# Altium PCB DC116A_PCB_ASCII.PcbDoc (part 2 of 5)
Units mil, origin at the board's own origin, x right, y up, seen from the top; angles counter-clockwise.
Board outline 3300 x 2000 mil, 4 copper layers (Top Layer, GND1, PWR SPLIT PLANE, Bottom Layer), stack 58.64 mil thick; 315 components, 191 nets, 877 pads, 364 vias.
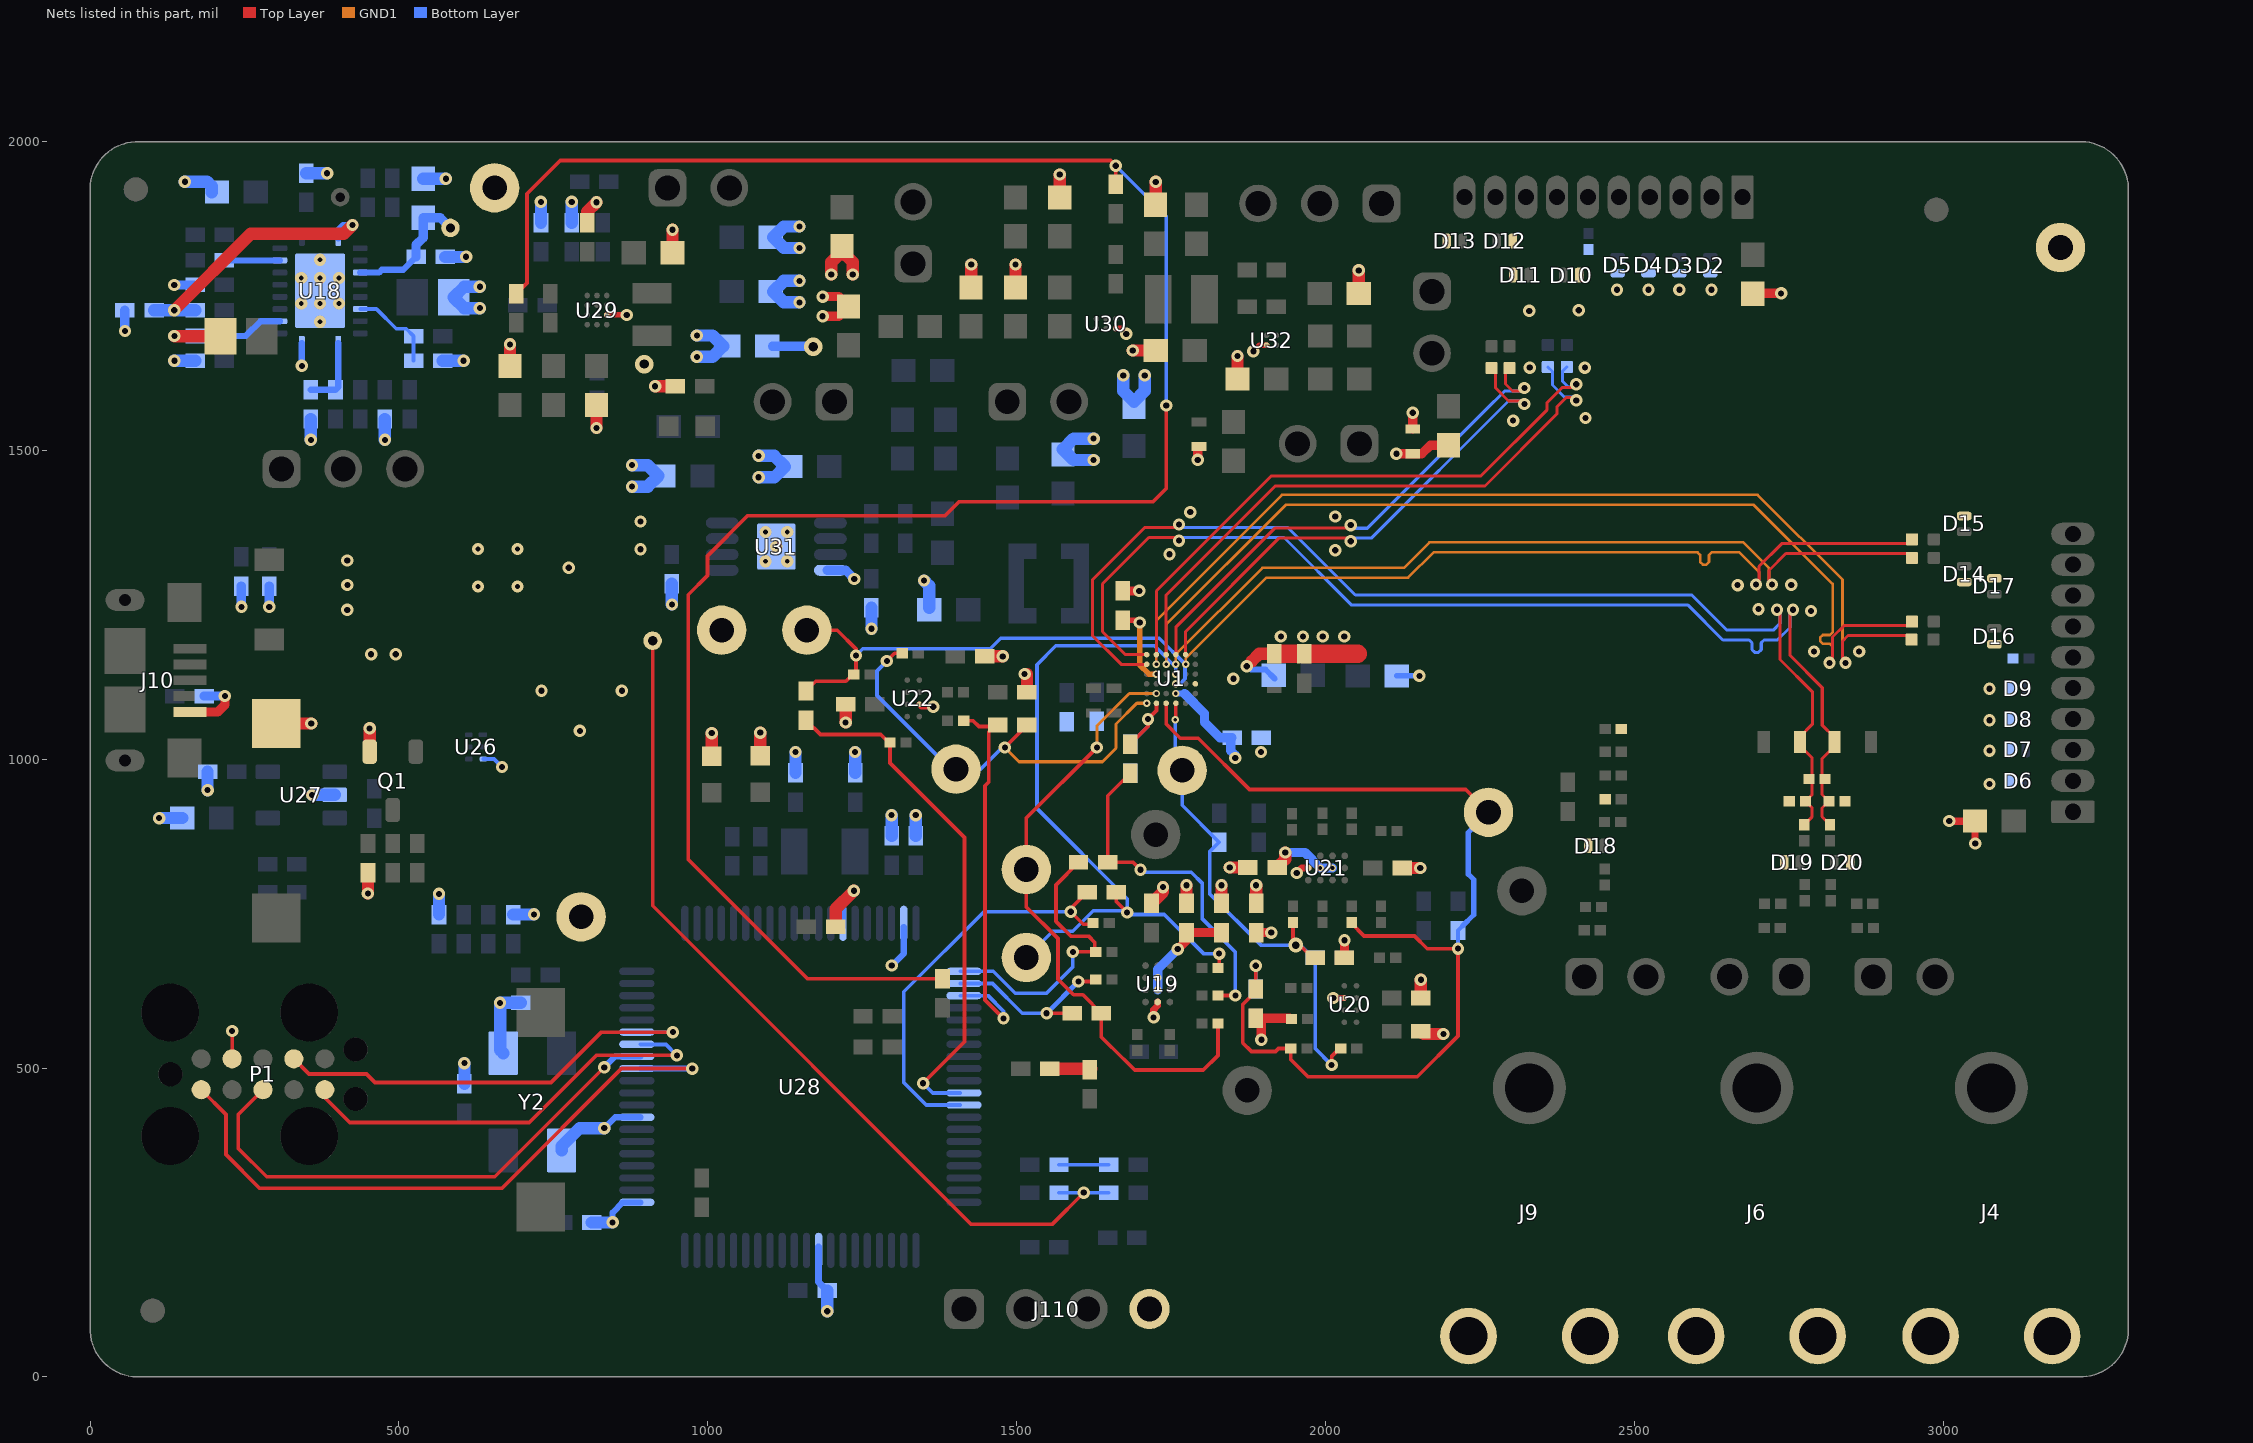
[diagram p4: the nets of this part, all layers, seen from the top]

## Part data
C1 C5 C6 C29 C54 C55 C56 C57 C59 C60 C61: library part CMP-0007007-5, "CAP, CERM, 10 uF, 25 V, +/- 20%, X5R, 0603", Cap_Case=0603, Manufacturer=TDK, PartNumber=C1608X5R1E106M080AC, Supplier Part Number 1=445-9015-1-ND, TempCo=X5R, Tolerance_%=20%, Value1="0.004639 ohm", Value2=25V, ValueDisplayed=10uF, AEC Category=Q200, AEC Grade=N/A, AEC Qualified=N, Cap_F=10µF, ComponentLink1Description="Datasheet link", ComponentLink1URL=https://product.tdk.com/en/search/capacitor/ceramic/mlcc/info?part_no=C1608X5R1E106M080AC, CompType=Capacitor, ESR_ohm=4.639m, IRMS_A=2.41407A, LatestRevisionDate=2017-03-09, MountType=SMT, PackageReference=0603, Polarized=N, Published=2008-06-19, Publisher="Texas Instruments", RoHS=Y, SizeArea_mm2=1.28, SizeAreaWB_mm2=4.68, SizeX_mm=1.6, SizeY_mm=0.8, SizeZ_mm=1, Supplier 1=Digi-Key, Supplier 2=Newark, Supplier 3=Mouser, Supplier Part Number 2=07W9179, Supplier Part Number 3=810-C1608X5R1E106M, TaMax_C=85°C, TaMin_C=-55°C, Technology=Ceramic, U/M=EA, VDC_V=25V
C2 C27 C73 C76: library part CMP-0006535-2, "CAP, CERM, 10 uF, 6.3 V, +/- 20%, X5R, 0402", Cap_Case=0402, Manufacturer=MuRata, Supplier Part Number 1=81-GRM155R60J106ME4D, TempCo=X5R, Tolerance_%=20%, Value1=Unknown, Value2=6.3V, ValueDisplayed=10uF, AEC Category=Q200, AEC Qualified=?, Cap_F=10µF, ComponentLink1Description="Datasheet link", ComponentLink1URL=https://sps06.itg.ti.com/sites/KMS/crossdivteams/altium/docs/ComponentDatasheets/grm155r60j106me44d.pdf, CompType=Capacitor, LatestRevisionDate=2017-03-09, MountType=SMT, PackageReference=0402, PartNumber=GRM155R60J106ME44D, Polarized=N, Published=2008-06-19, Publisher="Texas Instruments", RoHS=Y, SizeArea_mm2=0.5, SizeAreaWB_mm2=3, SizeX_mm=1, SizeY_mm=0.5, SizeZ_mm=0.7, Supplier 1=Mouser, TaMax_C=85°C, TaMin_C=-55°C, Technology=Ceramic, U/M=EA, VDC_V=6.3V
C3 C7 C64: library part CMP-0006296-2, "CAP, CERM, 1000 pF, 50 V, +/- 20%, X7R, 0402", Cap_Case=0402, Manufacturer=TDK, Supplier Part Number 1=445-173775-1-ND, TempCo=X7R, Tolerance_%=20%, Value1=Unknown, Value2=50V, ValueDisplayed=1000pF, AEC Category=Q200, AEC Grade=N/A, AEC Qualified=N, Cap_F=1nF, ComponentLink1Description="Datasheet link", ComponentLink1URL=https://product.tdk.com/info/en/catalog/datasheets/mlcc_commercial_soft_en.pdf, CompType=Capacitor, LatestRevisionDate=2017-03-09, MountType=SMT, PackageReference=0402, PartNumber=C1005X7R1H102M050BE, Polarized=N, Published=2008-06-19, Publisher="Texas Instruments", RoHS=Y, SizeArea_mm2=0.5, SizeAreaWB_mm2=3, SizeX_mm=1, SizeY_mm=0.5, SizeZ_mm=0.6, Supplier 1=Digi-Key, Supplier 2=Newark, Supplier 3=Mouser, Supplier Part Number 2=92Y5760, Supplier Part Number 3=810-C1005X7R1H102MBE, TaMax_C=125°C, TaMin_C=-55°C, Technology=Ceramic, U/M=EA, VDC_V=50V
C4 C8 C9 C10 C12 C14 C15 C17 C19 C20 C21 C22 C23 C24 C25 C26 C40 C43 C49 C50 C51: library part CMP-0006201-2, "CAP, CERM, 0.1 uF, 16 V, +/- 10%, X7R, 0402", Cap_Case=0402, Manufacturer=AVX, Supplier Part Number 1=478-7888-1-ND, TempCo=X7R, Tolerance_%=10%, Value1=Unknown, Value2=16V, ValueDisplayed=0.1uF, AEC Category=Q200, AEC Grade=N/A, AEC Qualified=N, Cap_F=100nF, ComponentLink1Description="Datasheet link", ComponentLink1URL=http://catalogs.avx.com/SurfaceMount.pdf, CompType=Capacitor, LatestRevisionDate=2017-03-09, MountType=SMT, PackageReference=0402, PartNumber=0402YC104KAT2A, Polarized=N, Published=2008-06-19, Publisher="Texas Instruments", RoHS=Y, SizeArea_mm2=0.5, SizeAreaWB_mm2=3, SizeX_mm=1, SizeY_mm=0.5, SizeZ_mm=0.6, Supplier 1=Digi-Key, Supplier 2=Newark, Supplier 3=Mouser, Supplier Part Number 2=09R7024, Supplier Part Number 3=581-0402YC104KAT2A, TaMax_C=125°C, TaMin_C=-55°C, Technology=Ceramic, U/M=EA, VDC_V=16V
C11: library part CMP-0006872-5, "CAP, CERM, 10 uF, 6.3 V, +/- 20%, X5R, 0603", Cap_Case=0603, Manufacturer=Kemet, PartNumber=C0603C106M9PACTU, Supplier Part Number 1=399-5504-1-ND, TempCo=X5R, Tolerance_%=20%, Value1="0.004 ohm", Value2=6.3V, ValueDisplayed=10uF, AEC Category=Q200, AEC Qualified=?, Cap_F=10µF, ComponentLink1Description="Datasheet link", ComponentLink1URL=http://www.kemet.com/kemet/web/homepage/kechome.nsf/vapubfiles/F3102_Y5V.pdf/$file/F3102_Y5V.pdf, CompType=Capacitor, ESR_ohm=4m, IRMS_A=8.9A, LatestRevisionDate=2017-03-09, MountType=SMT, PackageReference=0603, Polarized=N, Published=2008-06-19, Publisher="Texas Instruments", RoHS=Y, SizeArea_mm2=1.28, SizeAreaWB_mm2=4.68, SizeX_mm=1.6, SizeY_mm=0.8, SizeZ_mm=1, Supplier 1=Digi-Key, Supplier 2=Mouser, Supplier 3=Farnell, Supplier Part Number 2=80-C0603C106M9P, Supplier Part Number 3=1288201, TaMax_C=85°C, TaMin_C=-55°C, Technology=Ceramic, U/M=EA, VDC_V=6.3V
C13 C18: library part CMP-0012039-2, "CAP, TA, 22 uF, 6.3 V, +/- 20%, 5.4 ohm, SMD", Cap_Case=2012-10, Manufacturer=AVX, PartNumber=TLJN226M006R5400, Supplier Part Number 1=478-4768-1-ND, Tolerance_%=20%, Value1="5.4 ohm", Value2=6.3V, ValueDisplayed=22uF, AEC Category=Q200, AEC Grade=N/A, AEC Qualified=N, Cap_F=22µF, ComponentLink1Description="Datasheet link", ComponentLink1URL=http://www.avx.com/docs/Catalogs/tlj.pdf, CompType=Capacitor, ESR_ohm=5.4, LatestRevisionDate=2017-03-09, LatestRevisionNote="Updated supplier links", MountType=SMT, PackageReference=2012-10, Polarized=Y, Publisher="Texas Instruments", RoHS=Y, Series=TLJ, SizeArea_mm2=2.5, SizeAreaWB_mm2=6.75, SizeX_mm=2, SizeY_mm=1.25, SizeZ_mm=1, Supplier 1=Digi-Key, Supplier 2=Newark, Supplier 3=Mouser, Supplier Part Number 2=95M7480, Supplier Part Number 3=581-TLJN226M006R5400, TaMax_C=125°C, TaMin_C=-55°C, Technology=TA, U/M=EA, VDC_V=6.3V
C16 C65 C67 C68 C69 C70 C71: library part CMP-0007122-5, "CAP, CERM, 10 uF, 16 V, +/- 20%, X5R, 0603", Cap_Case=0603, Manufacturer="Taiyo Yuden", Supplier Part Number 1=587-3238-1-ND, TempCo=X5R, Tolerance_%=20%, Value1=Unknown, Value2=16V, ValueDisplayed=10uF, AEC Category=Q200, AEC Qualified=?, Cap_F=10µF, ComponentLink1Description="Datasheet link", ComponentLink1URL=http://ds.yuden.co.jp/TYCOMPAS/ut/detail.do?productNo=EMK107BBJ106MA-T&dataUnit=M, CompType=Capacitor, LatestRevisionDate=2017-03-09, MountType=SMT, PackageReference=0603, PartNumber=EMK107BBJ106MA-T, Polarized=N, Published=2008-06-19, Publisher="Texas Instruments", RoHS=Y, SizeArea_mm2=1.28, SizeAreaWB_mm2=4.68, SizeX_mm=1.6, SizeY_mm=0.8, SizeZ_mm=1, Supplier 1=Digi-Key, Supplier 2=Mouser, Supplier Part Number 2=963-EMK107BBJ106MA-T, TaMax_C=85°C, TaMin_C=-55°C, Technology=Ceramic, U/M=EA, VDC_V=16V
C30 C33 C36: library part CMP-0081665-1, "CAP, CERM, 0.047 µF, 25 V,+/- 10%, X5R, 0201", Cap_Case=0201, Manufacturer=TDK, Supplier Part Number 1=445-13679-1-ND, TempCo=X5R, Tolerance_%=10%, Value2=25V, ValueDisplayed=0.047µF, AEC Category=Q200, AEC Grade=N/A, AEC Qualified=N, Cap_F=47nF, ComponentLink1Description="Datasheet link", ComponentLink1URL=https://product.tdk.com/info/en/catalog/datasheets/mlcc_commercial_general_en.pdf, CompType=Capacitor, MountType=SMT, PackageReference=0201, PartNumber=C0603X5R1E473K030BB, Polarized=N, RoHS=Y, SizeArea_mm2=0.18, SizeAreaWB_mm2=2.08, SizeX_mm=0.6, SizeY_mm=0.3, SizeZ_mm=0.33, Supplier 1=Digi-Key, Supplier 2=Mouser, Supplier Part Number 2=810-C0603X5R1E473KBB, TaMax_C=85°C, TaMin_C=-55°C, Technology=Ceramic, U/M=EA, VDC_V=25V
C31 C34 C77: library part CMP-0009662-3, "CAP, CERM, 47 pF, 25 V, +/- 5%, C0G/NP0, 0201", Cap_Case=0201, Manufacturer=MuRata, Supplier Part Number 1=490-1256-1-ND, TempCo=C0G/NP0, Tolerance_%=5%, Value1=Unknown, Value2=25V, ValueDisplayed=47pF, AEC Category=Q200, AEC Grade=N/A, AEC Qualified=N, Cap_F=47pF, ComponentLink1Description="Datasheet link", ComponentLink1URL=http://search.murata.co.jp/Ceramy/image/img/A01X/G101/ENG/GRM0335C1E470JA01-01.pdf, CompType=Capacitor, LatestRevisionDate=2017-03-09, MountType=SMT, PackageReference=0201, PartNumber=GRM0335C1E470JA01D, Polarized=N, Published=2008-06-19, Publisher="Texas Instruments", RoHS=Y, SizeArea_mm2=0.18, SizeAreaWB_mm2=2.08, SizeX_mm=0.6, SizeY_mm=0.3, SizeZ_mm=0.33, Supplier 1=Digi-Key, Supplier 2=Newark, Supplier 3=Mouser, Supplier Part Number 2=80X8554, Supplier Part Number 3=81-GRM0335C1E470JA1D, TaMax_C=125°C, TaMin_C=-55°C, Technology=Ceramic, U/M=EA, VDC_V=25V
C32 C78: library part CMP-0009632-3, "CAP, CERM, 100 pF, 25 V, +/- 5%, C0G/NP0, 0201", Cap_Case=0201, Manufacturer=TDK, Supplier Part Number 1=445-4675-1-ND, TempCo=C0G/NP0, Tolerance_%=5%, Value1=Unknown, Value2=25V, ValueDisplayed=100pF, AEC Category=Q200, AEC Grade=N/A, AEC Qualified=N, Cap_F=100pF, ComponentLink1Description="Datasheet link", ComponentLink1URL=http://product.tdk.com/en/catalog/datasheets/mlcc_commercial_general_en.pdf, CompType=Capacitor, LatestRevisionDate=2017-03-09, MountType=SMT, PackageReference=0201, PartNumber=C0603C0G1E101J030BA, Polarized=N, Published=2008-06-19, Publisher="Texas Instruments", RoHS=Y, SizeArea_mm2=0.18, SizeAreaWB_mm2=2.08, SizeX_mm=0.6, SizeY_mm=0.3, SizeZ_mm=0.33, Supplier 1=Digi-Key, Supplier 2=Newark, Supplier 3=Farnell, Supplier Part Number 2=94W8063, Supplier Part Number 3=1843157, TaMax_C=125°C, TaMin_C=-55°C, Technology=Ceramic, U/M=EA, VDC_V=25V
C35: library part CMP-0009636-3, "CAP, CERM, 1000 pF, 25 V, +/- 10%, X5R, 0201", Cap_Case=0201, Manufacturer=TDK, Supplier Part Number 1=445-1790-1-ND, TempCo=X5R, Tolerance_%=10%, Value1=Unknown, Value2=25V, ValueDisplayed=1000pF, AEC Category=Q200, AEC Grade=N/A, AEC Qualified=N, Cap_F=1nF, ComponentLink1Description="Datasheet link", ComponentLink1URL=https://product.tdk.com/info/en/documents/chara_sheet/C0603X5R1E102K030BA.pdf, CompType=Capacitor, LatestRevisionDate=2017-03-09, MountType=SMT, PackageReference=0201, PartNumber=C0603X5R1E102K030BA, Polarized=N, Published=2008-06-19, Publisher="Texas Instruments", RoHS=Y, SizeArea_mm2=0.18, SizeAreaWB_mm2=2.08, SizeX_mm=0.6, SizeY_mm=0.3, SizeZ_mm=0.33, Supplier 1=Digi-Key, Supplier 2=Newark, Supplier 3=Mouser, Supplier Part Number 2=91R0003, Supplier Part Number 3=810-C0603X5R1E102K, TaMax_C=85°C, TaMin_C=-55°C, Technology=Ceramic, U/M=EA, VDC_V=25V
C37: library part CMP-0006683-2, "CAP, CERM, 2200 pF, 50 V, +/- 10%, X7R, 0402", Cap_Case=0402, Manufacturer=MuRata, PartNumber=GRM155R71H222KA01D, Supplier Part Number 1=490-1305-1-ND, TempCo=X7R, Tolerance_%=10%, Value1=Unknown, Value2=50V, ValueDisplayed=2200pF, AEC Category=Q200, AEC Qualified=?, Cap_F=2.2nF, ComponentLink1Description="Datasheet link", ComponentLink1URL=http://search.murata.co.jp/Ceramy/PnsearchViewAction.do?HnOFG=ON&HnNFG=ON&SEL_CNT=50&sLang=en&sKey=GRM155R71H222KA01D&x=9&y=9&search=startwith, CompType=Capacitor, LatestRevisionDate=2017-03-09, MountType=SMT, PackageReference=0402, Polarized=N, Published=2008-06-19, Publisher="Texas Instruments", RoHS=Y, SizeArea_mm2=0.5, SizeAreaWB_mm2=3, SizeX_mm=1, SizeY_mm=0.5, SizeZ_mm=0.6, Supplier 1=Digi-Key, Supplier 2=Newark, Supplier 3=Mouser, Supplier Part Number 2=14T3287, Supplier Part Number 3=81-GRM36X222K50, TaMax_C=125°C, TaMin_C=-55°C, Technology=Ceramic, U/M=EA, VDC_V=50V
C38 C39 C46 C48 C62: library part CMP-0006207-2, "CAP, CERM, 10 pF, 50 V, +/- 5%, C0G/NP0, 0402", Cap_Case=0402, Manufacturer="Johanson Technology", TempCo=C0G/NP0, Tolerance_%=5%, Value1=Unknown, Value2=50V, ValueDisplayed=10pF, AEC Category=Q200, AEC Qualified=?, Cap_F=10pF, ComponentLink1Description="Datasheet link", ComponentLink1URL=http://www.johansontechnology.com/images/stories/catalog/JTI_CAT_2012_MLCC_HighQ.pdf, CompType=Capacitor, LatestRevisionDate=2017-03-09, MountType=SMT, PackageReference=0402, PartNumber=500R07S100JV4T, Polarized=N, Published=2008-06-19, Publisher="Texas Instruments", RoHS=Y, SizeArea_mm2=0.5, SizeAreaWB_mm2=3, SizeX_mm=1, SizeY_mm=0.5, SizeZ_mm=0.6, TaMax_C=125°C, TaMin_C=-55°C, Technology=Ceramic, U/M=EA, VDC_V=50V
C41: library part CMP-0006268-2, "CAP, CERM, 4.7 uF, 10 V, +/- 10%, X5R, 0402", Cap_Case=0402_065, Manufacturer=TDK, PartNumber=C1005X5R1A475K050BC, Supplier Part Number 1=445-13820-1-ND, TempCo=X5R, Tolerance_%=10%, Value1="0.003417 ohm", Value2=10V, ValueDisplayed=4.7uF, AEC Category=Q200, AEC Grade=N/A, AEC Qualified=N, Cap_F=4.7µF, ComponentLink1Description="Datasheet link", ComponentLink1URL=https://product.tdk.com/en/search/capacitor/ceramic/mlcc/info?part_no=C1005X5R1A475K050BC, CompType=Capacitor, ESR_ohm=3.417m, IRMS_A=2.7063A, LatestRevisionDate=2017-03-09, MountType=SMT, PackageReference=0402, Polarized=N, Published=2008-06-19, Publisher="Texas Instruments", RoHS=Y, SizeArea_mm2=0.5, SizeAreaWB_mm2=3, SizeX_mm=1, SizeY_mm=0.5, SizeZ_mm=0.65, Supplier 1=Digi-Key, Supplier 2=Newark, Supplier 3=Mouser, Supplier Part Number 2=29X4772, Supplier Part Number 3=810-C1005X5R1A475KBC, TaMax_C=85°C, TaMin_C=-55°C, Technology=Ceramic, U/M=EA, VDC_V=10V
C42: library part CMP-0006906-5, "CAP, CERM, 2.2 uF, 10 V, +/- 10%, X5R, 0603", Cap_Case=0603, Manufacturer=Kemet, PartNumber=C0603C225K8PACTU, Supplier Part Number 1=399-4911-1-ND, TempCo=X5R, Tolerance_%=10%, Value1=Unknown, Value2=10V, ValueDisplayed=2.2uF, AEC Category=Q200, AEC Qualified=?, Cap_F=2.2µF, ComponentLink1Description="Datasheet link", ComponentLink1URL=http://www.kemet.com/kemet/web/homepage/kechome.nsf/vapubfiles/F3102_Y5V.pdf/$file/F3102_Y5V.pdf, CompType=Capacitor, LatestRevisionDate=2017-03-09, MountType=SMT, PackageReference=0603, Polarized=N, Published=2008-06-19, Publisher="Texas Instruments", RoHS=Y, SizeArea_mm2=1.28, SizeAreaWB_mm2=4.68, SizeX_mm=1.6, SizeY_mm=0.8, SizeZ_mm=1, Supplier 1=Digi-Key, Supplier 2=Mouser, Supplier 3=Farnell, Supplier Part Number 2=80-C0603C225K8P, Supplier Part Number 3=1108322, TaMax_C=85°C, TaMin_C=-55°C, Technology=Ceramic, U/M=EA, VDC_V=10V
C44 C45: library part CMP-0006345-2, "CAP, CERM, 12 pF, 50 V, +/- 5%, C0G/NP0, 0402", Cap_Case=0402, Manufacturer="Samsung Electro-Mechanics", Supplier Part Number 1=1276-1178-1-ND, TempCo=C0G/NP0, Tolerance_%=5%, Value1=Unknown, Value2=50V, ValueDisplayed=12pF, AEC Category=Q200, AEC Grade=N/A, AEC Qualified=N, Cap_F=12pF, ComponentLink1Description="Datasheet link", ComponentLink1URL=http://www.samsungsem.com/servlet/FileDownload?type=spec&file=CL05C120JB5NNNC.pdf, CompType=Capacitor, LatestRevisionDate=2017-03-09, MountType=SMT, PackageReference=0402, PartNumber=CL05C120JB5NNNC, Polarized=N, Published=2008-06-19, Publisher="Texas Instruments", RoHS=Y, SizeArea_mm2=0.5, SizeAreaWB_mm2=3, SizeX_mm=1, SizeY_mm=0.5, SizeZ_mm=0.6, Supplier 1=Digi-Key, TaMax_C=125°C, TaMin_C=-55°C, Technology=Ceramic, U/M=EA, VDC_V=50V
C47: library part CMP-0006199-2, "CAP, CERM, 0.47 uF, 6.3 V, +/- 10%, X5R, 0402", Cap_Case=0402, Manufacturer=AVX, Supplier Part Number 1=478-6196-1-ND, TempCo=X5R, Tolerance_%=10%, Value1=Unknown, Value2=6.3V, ValueDisplayed=0.47uF, AEC Category=Q200, AEC Grade=N/A, AEC Qualified=N, Cap_F=470nF, ComponentLink1Description="Datasheet link", ComponentLink1URL=http://catalogs.avx.com/SurfaceMount.pdf, CompType=Capacitor, LatestRevisionDate=2017-03-09, MountType=SMT, PackageReference=0402, PartNumber=04026D474KAT2A, Polarized=N, Published=2008-06-19, Publisher="Texas Instruments", RoHS=Y, SizeArea_mm2=0.5, SizeAreaWB_mm2=3, SizeX_mm=1, SizeY_mm=0.5, SizeZ_mm=0.6, Supplier 1=Digi-Key, Supplier 2=Newark, Supplier 3=Mouser, Supplier Part Number 2=60R6163, Supplier Part Number 3=581-04026D474KAT2A, TaMax_C=85°C, TaMin_C=-55°C, Technology=Ceramic, U/M=EA, VDC_V=6.3V
C52 C53: library part CMP-0007303-5, "CAP, CERM, 10 uF, 6.3 V, +/- 20%, X5R, 0603", Cap_Case=0603, Manufacturer=MuRata, PartNumber=GRM188R60J106ME47D, Supplier Part Number 1=490-3896-1-ND, TempCo=X5R, Tolerance_%=20%, Value1="0.009 ohm", Value2=6.3V, ValueDisplayed=10uF, AEC Category=Q200, AEC Qualified=?, Cap_F=10µF, ComponentLink1Description="Datasheet link", ComponentLink1URL=http://www.murata.com/products/capacitor/tech_data/pdf/grm188r60j106m.pdf, CompType=Capacitor, ESR_ohm=9m, IRMS_A=2.74A, LatestRevisionDate=2017-03-09, MountType=SMT, PackageReference=0603, Polarized=N, Published=2008-06-19, Publisher="Texas Instruments", RoHS=Y, SizeArea_mm2=1.28, SizeAreaWB_mm2=4.68, SizeX_mm=1.6, SizeY_mm=0.8, SizeZ_mm=1, Supplier 1=Digi-Key, Supplier 2=Mouser, Supplier 3=Farnell, Supplier Part Number 2=81-GRM188R60J106ME47, Supplier Part Number 3=1735528, TaMax_C=125°C, TaMin_C=-55°C, Technology=Ceramic, U/M=EA, VDC_V=6.3V
C58 C74 C75: library part CMP-0086152-1, "CAP, CERM, 1 µF, 25 V,+/- 10%, X5R, 0603", Cap_Case=0603, Manufacturer="Taiyo Yuden", TempCo=X5R, Tolerance_%=10%, Value2=25V, ValueDisplayed=1µF, AEC Category=Q200, AEC Grade=N/A, AEC Qualified=N, Cap_F=1µF, ComponentLink1Description="Datasheet link", ComponentLink1URL=http://ds.yuden.co.jp/TYCOMPAS/ut/detail.do?productNo=TMK107BJ105KA-T&fileName=TMK107BJ105KA-T_SS&mode=specSheetDownload, CompType=Capacitor, Green_EU RoHS=Passed, Green_EU RoHS-2=Passed, Green_Lifecycle=Active, Green_REACh=Passed, MountType=SMT, PackageReference=0603, PartNumber=TMK107BJ105KA-T, Polarized=N, RoHS=Y, SizeArea_mm2=1.28, SizeAreaWB_mm2=4.68, SizeX_mm=1.6, SizeY_mm=0.8, SizeZ_mm=1, TaMax_C=85°C, TaMin_C=-55°C, Technology=Ceramic, U/M=EA, VDC_V=25V
C63: library part CMP-0080060-1, "CAP, CERM, 22 pF, 250 V,+/- 5%, C0G/NP0, AEC-Q200 Grade 1, 0603", Cap_Case=0603, Manufacturer="Yageo America", Supplier Part Number 1=311-3095-1-ND, TempCo=C0G/NP0, Tolerance_%=5%, Value2=250V, ValueDisplayed=22pF, AEC Category=Q200, AEC Grade=1, AEC Qualified=Y, Cap_F=22pF, ComponentLink1Description="Datasheet link", ComponentLink1URL=http://www.yageo.com/documents/recent/UPY-AC_NP0X7R_16V-to-630V_8.pdf, CompType=Capacitor, MountType=SMT, PackageReference=0603, PartNumber=AC0603JRNPOYBN220, Polarized=N, RoHS=Y, SizeArea_mm2=1.28, SizeAreaWB_mm2=4.68, SizeX_mm=1.6, SizeY_mm=0.8, SizeZ_mm=1, Supplier 1=Digi-Key, Supplier 2=Mouser, Supplier Part Number 2=603-AC603JRNPOYBN220, TaMax_C=125°C, TaMin_C=-55°C, Technology=Ceramic, U/M=EA, VDC_V=250V
C66 C72: library part CMP-0006355-2, "CAP, CERM, 0.01 uF, 50 V, +/- 10%, C0G/NP0, 0402", Cap_Case=0402, Manufacturer=MuRata, PartNumber=GCM155R71H103KA55D, Supplier Part Number 1=490-4762-1-ND, TempCo=C0G/NP0, Tolerance_%=10%, Value1=Unknown, Value2=50V, ValueDisplayed=0.01uF, AEC Category=Q200, AEC Qualified=?, Cap_F=10nF, ComponentLink1Description="Datasheet link", ComponentLink1URL=http://psearch.en.murata.com/capacitor/product/GCM155R71H103KA55%23.pdf, CompType=Capacitor, LatestRevisionDate=2017-03-09, MountType=SMT, PackageReference=0402, Polarized=N, Published=2008-06-19, Publisher="Texas Instruments", RoHS=Y, SizeArea_mm2=0.5, SizeAreaWB_mm2=3, SizeX_mm=1, SizeY_mm=0.5, SizeZ_mm=0.6, Supplier 1=Digi-Key, Supplier 2=Mouser, Supplier Part Number 2=81-GCM155R71H103KA5D, TaMax_C=125°C, TaMin_C=-55°C, Technology=Ceramic, U/M=EA, VDC_V=50V
D1: library part CMP-0028543-1, "Diode, Schottky, 40 V, 0.35 A, SOD-123", Manufacturer="Diodes Inc.", PartNumber=SD103AW-7-F, Supplier Part Number 1=SD103-AWDICT-ND, Value1=0.35A, Value2=0.55V, AEC Category=Q101, AEC Qualified=?, ComponentLink1Description="Datasheet link", ComponentLink1URL=http://www.diodes.com/datasheets/ds11013.pdf, CompType=Diode, Green_EU RoHS=Passed, Green_EU RoHS-2=Passed, Green_Lifecycle=Active, Green_REACh=Passed, Io_A=3.5dA, LatestRevisionDate=2017-05-08, MountType=SMT, PackageReference=SOD-123, Published=2008-06-26, Publisher="Texas Instruments", RoHS=Y, SizeArea_mm2=6.545, SizeAreaWB_mm2=13.095, SizeX_mm=3.85, SizeY_mm=1.7, SizeZ_mm=1.35, Supplier 1=Digi-Key, Supplier 2=Mouser, Supplier 3=Farnell, Supplier Part Number 2=621-SD103AW-F, Supplier Part Number 3=1773500, Type=Schottky, U/M=EA, Vf_V=5.5dV, Vr_V=40V
D2 D3 D4 D5 D6 D7 D8 D9 D10 D11 D12 D13 D14 D15 D16 D17 D18 D19 D20: library part CMP-0073604-3, "1-Channel ESD Protection Diode With Low Dynamic Resistance for HDMI 2.0 and USB 3.0, DPY0002A (X1SON-2)", Alternate Manufacturer="Texas Instruments", Alternate PartNumber=TPD1E04U04DPYT, Operating Temperature Range="-40 to 125 C", Rating=Catalog, AEC Category=Q200, ComponentLink1Description="Datasheet Link", ComponentLink1URL=http://www.ti.com/lit/ds/symlink/tpd1e04u04.pdf, ComponentLink2Description="Product Folder", ComponentLink2URL=http://www.ti.com/product/tpd1e04u04, ComponentLink3Description="Online Datasheet", ComponentLink3URL=http://www.ti.com/product/tpd1e04u04/datasheet, CompType=IC, Manufacturer="Texas Instruments", MountType=SMT, PackageDescription=X1SON-2, PackageReference=DPY0002A, PartNumber=TPD1E04U04DPYR, SizeArea_mm2=0.6, SizeAreaWB_mm2=3.2, SizeX_mm=1.0, SizeY_mm=0.6, SizeZ_mm=0.45
FID1 FID2 FID3 FID4 FID5 FID6: library part CMP-0077181-1, "Fiducial mark.  There is nothing to buy or mount.", Manufacturer=N/A, ClassName=FiducialMark, CompType=Fiducial, MountType=N/A, PackageReference=N/A, PartNumber=N/A
J1 J2: library part CMP-0055062-1, "Receptacle, 50mil, 10x1, Gold, R/A, TH", Manufacturer=Mill-Max, PartNumber=851-43-010-20-001000, CNHeader=FALSE, ComponentLink1Description="Datasheet URL", ComponentLink1URL=https://www.mill-max.com/assets/pdfs/036.PDF, CompType="Socket Strip", CT=TRUE, Green_EU RoHS="Passed with Exemption", Green_EU RoHS-2=Incomplete, Green_Lifecycle=Active, Green_REACh=Passed, LatestRevisionDate=26/05/2017, MountType=TH, PackageReference="receptacle 10x1, 50mil", Publisher="Texas Instruments", RoHS=Y
J3 J17: library part CMP-0075530-2, "Header, 2.54 mm, 3x1, Tin, TH", Color=Black, Current_A=6.3A, Manufacturer=Samtec, PartNumber=TSW-103-07-T-S, Supplier Part Number 1=SAM1035-03-ND, Voltage_V=550V, Cert_CSA=Y, Cert_CULUS=N, Cert_UL=Y, Cert_VDE=N, ClassName=Header, ComponentLink1Description="Datasheet URL", ComponentLink1URL=http://www.samtec.com/ftppub/cpdf/TSW-XXX-XX-XXX-X-XX-XXX-MKT.pdf, CompType=Header, ContactFinish=Tin, Gender=Male, Green_EU RoHS=Passed, Green_EU RoHS-2=Passed, Green_Lifecycle=Active, Green_REACh=Passed, MountType=TH, Orientation=Vertical, PackageReference="Header, 2.54 mm, 3x1, TH", PinCount=3, Pitch_mm=2.54, RoHS=Y, Row_Count=1, Shrouded=N, Supplier 1=Digi-Key, Supplier 2=Newark, Supplier 3=Farnell, Supplier Part Number 2=12P1325, Supplier Part Number 3=2035682
J4 J6 J9: library part CMP-0084074-1, "Touchproof Jack, R/A, TH", Color=Black, Current_A=8A, Manufacturer=PlasticsOne, Voltage_V=1kV, ComponentLink1Description="Datasheet URL", ComponentLink1URL=http://www.plastics1.com/dash50/41828_dash50.pdf, CompType=JACK, ContactFinish=Gold, Gender=Male, MountType=TH, Orientation=R/A, PackageReference="Touchproof Jack, R/A, TH", PartNumber=41828, PinCount=3
J5 J7 J8 J11 J12 J13 J14 J15 J16: library part CMP-0075508-2, "Header, 2.54 mm, 2x1, Tin, TH", Color=Black, Current_A=6.3A, Manufacturer=Samtec, PartNumber=TSW-102-07-T-S, Supplier Part Number 1=SAM1035-02-ND, Voltage_V=550V, Cert_CSA=Y, Cert_CULUS=N, Cert_UL=Y, Cert_VDE=N, ClassName=Header, ComponentLink1Description="Datasheet URL", ComponentLink1URL=http://www.samtec.com/documents/webfiles/pdf/TSW_TH.PDF, CompType=Header, ContactFinish=Tin, Gender=Male, Green_EU RoHS=Passed, Green_EU RoHS-2=Passed, Green_Lifecycle=Active, Green_REACh=Passed, MountType=TH, Orientation=Vertical, PackageReference="Header, 2.54 mm, 2x1, TH", PinCount=2, Pitch_mm=2.54, RoHS=Y, Row_Count=1, Shrouded=N, Supplier 1=Digi-Key, Supplier 2=Newark, Supplier 3=Farnell, Supplier Part Number 2=12P1261, Supplier Part Number 3=2035681
J10: library part CMP-0065029-1, "Connector, Receptacle, USB Micro B, R/A, SMT", Color=Black, Manufacturer=FCI, PartNumber=10118193-0001LF, Supplier Part Number 1=609-4616-1-ND, CNHeader=False, ComponentLink1Description="Datasheet URL", ComponentLink1URL=https://sps06.itg.ti.com/sites/KMS/crossdivteams/altium/docs/ComponentDatasheets/10118193-0001LF.pdf, CompType=USB, ContactFinish=Gold, CT=True, Gender=Female, LatestRevisionDate=2017-06-05, MountType=SMT, Orientation=R/A, PackageReference="Connector, Receptacle, USB Micro B, R/A, SMT", PinCount=5, Pitch_mm=0.65, Publisher="Texas Instruments", Row_Count=1, Supplier 1=Digi-Key, Supplier 2=Newark, Supplier 3=Mouser, Supplier Part Number 2=67T2259, Supplier Part Number 3=649-10118193-0001LF
J110: library part CMP-0075409-2, "Header, 100mil, 4x1, Gold, TH", Color=Black, Current_A=6.3A, Manufacturer=Samtec, PartNumber=TSW-104-07-G-S, Supplier Part Number 1=SAM1029-04-ND, Voltage_V=550V, Cert_CSA=Y, Cert_CULUS=N, Cert_UL=Y, Cert_VDE=N, ClassName=Header, ComponentLink1Description="Datasheet URL", ComponentLink1URL=http://samtec.com/ftppub/pdf/TSW_TH.PDF, CompType=Header, ContactFinish=Gold, Gender=Male, Green_EU RoHS=Passed, Green_EU RoHS-2=Passed, Green_Lifecycle=Active, Green_REACh=Passed, MountType=TH, Orientation=Vertical, PackageReference="4x1 Header", PinCount=4, Pitch_mm=2.54, RoHS=Y, Row_Count=1, Shrouded=N, Supplier 1=Digi-Key
L1 L2 L3 L4 L12 L13 L14 L15: library part CMP-0080017-1, "Inductor, Ferrite Bead, Ferrite, 0.2 A, 2.1 ohm, SMD", Manufacturer=TDK, Supplier Part Number 1=445-6748-1-ND, Value1="2.1 ohm", Value2=0.2A, AEC Category=Q200, AEC Grade=N/A, AEC Qualified=N, ComponentLink1Description="Datasheet link", ComponentLink1URL=https://product.tdk.com/info/en/catalog/datasheets/beads_commercial_signal_mmz1005-e_en.pdf, CompType=Inductor, DCR_ohm=2.1, Imax_A=200mA, Material=Ferrite, MountType=SMT, PackageReference=1x0.5mm, PartNumber=MMZ1005S182ET000, RoHS=Y, SizeArea_mm2=0.5, SizeAreaWB_mm2=3, SizeX_mm=1, SizeY_mm=0.5, SizeZ_mm=0.55, Supplier 1=Digi-Key, Supplier 2=Newark, Supplier 3=Mouser, Supplier Part Number 2=88T9797, Supplier Part Number 3=810-MMZ1005S182ET000, Technology="Ferrite Bead"
L5: library part CMP-0058917-2, "Inductor, Wirewound, Powdered Iron, 1.5 µH, 1.8 A, 0.114 ohm, SMD", Manufacturer=MuRata, PartNumber=1286AS-H-1R5M=P2, Supplier Part Number 1=490-10604-1-ND, Value1="0.114 ohm", Value2=1.8A, ValueDisplayed=1.5µH, AEC Category=Q200, AEC Grade=N/A, AEC Qualified=N, ComponentLink1Description="Datasheet link", ComponentLink1URL=http://psearch.en.murata.com/inductor/product/1286AS-H-1R5M_.pdf, CompType=Inductor, DCR_ohm=1.14d, Green_EU RoHS=Incomplete, Green_EU RoHS-2=Incomplete, Green_Lifecycle="Not Set", Green_REACh=Incomplete, Imax_A=1.8A, Ind_H=1.5µH, Irms="1.8A @ 40C rise", Isat="2A @ 30% inductance drop", LatestRevisionDate=2017-08-04, Material="Powdered Iron", MountType=SMT, PackageReference=2.0x1.2x1.6mm, Published=2008-06-26, Publisher="Texas Instruments", RoHS=Y, SizeArea_mm2=3.96, SizeAreaWB_mm2=8.96, SizeX_mm=2.2, SizeY_mm=1.8, SizeZ_mm=1.2, Supplier 1=Digi-Key, Supplier 2=Newark, Supplier 3=Mouser, Supplier Part Number 2=81Y7599, Supplier Part Number 3=81-1286AS-H-1R5MP2, Technology=Wirewound
L6: library part CMP-0063791-1, "Inductor, Wirewound, Ferrite, 2.2 uH, 1.8 A, 0.08 ohm, SMD", Manufacturer="Wurth Elektronik", PartNumber=74404024022, Supplier Part Number 1=732-5436-1-ND, Value1="0.08 ohm", Value2=1.8A, ValueDisplayed=2.2uH, AEC Category=Q200, AEC Grade=N/A, AEC Qualified=N, ComponentLink1Description="Datasheet link", ComponentLink1URL=http://katalog.we-online.de/pbs/datasheet/74404024022.pdf, CompType=Inductor, DCR_ohm=0.08, Green_EU RoHS=Passed, Green_EU RoHS-2=Incomplete, Green_Lifecycle=Active, Green_REACh=Passed, Imax_A=1.8A, Ind_H=2.2µH, Irms="1.8A @ 40C rise", Isat="1.95A @ 30% inductance drop", LatestRevisionDate=2017-06-02, Material=Ferrite, MountType=SMT, PackageReference="SMD, 2.5x2mm", Published=2008-06-26, Publisher="Texas Instruments", RoHS=Y, SizeArea_mm2=5, SizeAreaWB_mm2=10.5, SizeX_mm=2.5, SizeY_mm=2, SizeZ_mm=1.2, Supplier 1=Digi-Key, Supplier 2=Newark, Supplier 3=Mouser, Supplier Part Number 2=75X1095, Supplier Part Number 3=710-74404024022, Technology=Wirewound
L7 L9 L10 L11: library part CMP-0003344-2, "Ferrite Bead, 120 ohm @ 100 MHz, 0.5 A, 0603", Manufacturer=MuRata, PartNumber=BLM18AG121SN1D, Supplier Part Number 1=490-1011-1-ND, Value1="0.18 ohm", Value2=0.5A, ValueDisplayed="120 ohm", ComponentLink1Description="Datasheet link", ComponentLink1URL=http://search.murata.co.jp/Ceramy/image/img/PDF/ENG/L0110S0100BLM18A.pdf, CompType="Ferrite Bead", DCR_ohm=1.8d, Imax_A=5dA, LatestRevisionDate=2017-03-09, MountType=SMT, PackageReference=0603, Published=2014-04-30, Publisher="Texas Instruments", RoHS=Y, SizeArea_mm2=1.28, SizeAreaWB_mm2=4.68, SizeX_mm=1.6, SizeY_mm=0.8, SizeZ_mm=1, Supplier 1=Digi-Key, Supplier 2=Newark, Supplier 3=Mouser, Supplier Part Number 2=73M9051, Supplier Part Number 3=81-BLM11A121S, Ztyp@1GHz_Ohm=120, ZTyp@100MHz_Ohm=120
L8: library part CMP-0060433-1, "Inductor, Shielded, Ferrite, 10 uH, 0.48 A, 0.54 ohm, SMD", Manufacturer=Coilcraft, PartNumber=LPS3010-103MRB, Supplier Part Number 1=994-LPS3010-103MRB, Value1="0.54 ohm", Value2=0.48A, ValueDisplayed=10uH, AEC Category=Q200, AEC Qualified=?, ComponentLink1Description="Datasheet link", ComponentLink1URL=http://www.coilcraft.com/pdfs/lps3010.pdf, CompType=Inductor, DCR_ohm=5.4d, Green_EU RoHS=Incomplete, Green_EU RoHS-2=Incomplete, Green_Lifecycle="Not Set", Green_REACh=Incomplete, Imax_A=4.8dA, Ind_H=10µH, Irms="0.48A @ 20C rise", Isat="0.5A @ 10% inductance drop", LatestRevisionDate=2017-06-02, Material=Ferrite, MountType=SMT, PackageReference=LPS3010, Published=2008-06-26, Publisher="Texas Instruments", RoHS=Y, SizeArea_mm2=8.7025, SizeAreaWB_mm2=15.6025, SizeX_mm=2.95, SizeY_mm=2.95, SizeZ_mm=0.9, Supplier 1=Mouser, Supplier 2=Farnell, Supplier Part Number 2=2408002, Technology=Shielded
LBL1: library part CMP-0003625-1, "Thermal Transfer Printable Labels, 0.650\" W x 0.200\" H - 10,000 per roll", Manufacturer=Brady, Supplier Part Number 1=97C5133, ClassName=Label, ComponentLink1Description="Web Page", ComponentLink1URL=http://www.bradyid.com/bradyid/pdpv/THT-14-423-10.html, CompType=Label, Key=THT-14-423-10, LatestRevisionDate=2017-03-09, MountType=N/A, Note="Size: 0.65\" x 0.20 \"", PackageReference="PCB Label 0.650 x 0.200 inch", PartNumber=THT-14-423-10, Publisher="Texas Instruments", RoHS=Y, Supplier 1=Newark, Supplier 2=Farnell, Supplier Part Number 2=2065596
LED1 LED3: library part CMP-0002834-1, "LED, Green, SMD", Color=green, Manufacturer=Lumex, PartNumber=SML-LX0603GW-TR, Supplier Part Number 1=67-1549-1-ND, Value1=W, Value2=2.2V, ComponentLink1Description="Datasheet link", ComponentLink1URL=http://www.lumex.com/specs/SML-LX0603GW-TR.pdf, CompType=LED, Io_A=20mA, LatestRevisionDate=2017-03-09, MountType=SMT, PackageReference="LED, GREEN, 0603", Published=2008-07-11, Publisher="Texas Instruments", RoHS=Y, Supplier 1=Digi-Key, Supplier 2=Newark, Supplier 3=Mouser, Supplier Part Number 2=75K1440, Supplier Part Number 3=696-SML-LX0603GW, TJmax_C=85°C, Type=?, U/M=EA, Vf_V=2.2V
LED2: library part CMP-0002876-1, "LED, Super Red, SMD", Color="super red", Manufacturer=Lumex, PartNumber=SML-LX0603SRW-TR, Supplier Part Number 1=67-1551-1-ND, Value1=W, Value2=1.7V, ComponentLink1Description="Datasheet link", ComponentLink1URL=http://www.lumex.com/specs/SML-LX0603SRW-TR.pdf, CompType=LED, Io_A=20mA, LatestRevisionDate=2017-03-09, MountType=SMT, PackageReference="LED, 1.6x.6x.8mm", Published=2008-07-11, Publisher="Texas Instruments", RoHS=Y, Supplier 1=Digi-Key, Supplier 2=Newark, Supplier 3=Mouser, Supplier Part Number 2=09J9551, Supplier Part Number 3=696-SML-LX0603SRW, Type=?, U/M=EA, Vf_V=1.7V
Logo1: library part CMP-0074769-1, Lib Reference="WEEE logo", PartNumber="WEEE logo"
LOGO2: library part CMP-0074844-1, LatestRevisionDate=2017-07-06, Lib Reference="CE Mark", PartNumber="CE Mark", Published=2009-03-03, Publisher="Texas Instruments", SymbolCreator=a0412235
Logo3: library part CMP-0074838-1, "Texas Instrument Corporate Signature", ClassName=Logo, LatestRevisionDate=2017-07-06, Lib Reference=TI_Logo, PartNumber="Texas Instruments", Published=2009-03-03, Publisher="Texas Instruments", SymbolCreator=a0412235, SymbolVersion=2011-08-22
Logo4: library part CMP-0074847-1, "FCC_disclaimer", LatestRevisionDate=2017-07-06, Lib Reference=FCC_disclaimer, PartNumber="FCC disclaimer", Published=2009-03-03, Publisher="Texas Instruments"
P1: library part CMP-0075050-1, "Footprint for Tag-Connect TC2050 cables", Manufacturer=Tag-Connect, PartNumber=TC2050-IDC-FP, CNHeader=False, ComponentLink1Description="Datasheet URL", ComponentLink1URL=http://www.tag-connect.com/Materials/TC2050-IDC%20Datasheet.pdf, CompType=Receptacle, CT=False, LatestRevisionDate=2017-07-12, MountType=N/A, Note="Footprint only, to mate with Tag-Connect TC2050 cables", PackageReference="Footprint for TC2050 series of cables", Publisher="Texas Instruments", RoHS=Y
Q1: library part CMP-0000465-2, "Transistor, NPN, 25 V, 0.05 A, SOT-23", Manufacturer="ON Semiconductor", Supplier Part Number 1=MMBT5089LT1GOSCT-ND, Value1="0.05 A", Value2=1200, AEC Category=Q101, AEC Qualified=?, ComponentLink1Description="Datasheet link", ComponentLink1URL=http://www.onsemi.com/pub_link/Collateral/MMBT5088LT1-D.PDF, CompType=BJT, HfeMax=1200, IcRated_A=50mA, LatestRevisionDate=2017-03-09, MountType=SMT, NPN=1, PackageReference=SOT-23, PartNumber=MMBT5089LT1G, PNP=0, Published=2008-07-31, Publisher="Texas Instruments", RoHS=Y, SizeArea_mm2=7.5, SizeAreaWB_mm2=14, SizeX_mm=2.5, SizeY_mm=3, SizeZ_mm=1.1, Supplier 1=Digi-Key, Supplier 2=Newark, Supplier 3=Mouser, Supplier Part Number 2=98H0755, Supplier Part Number 3=863-MMBT5089LT1G, TaMax_C=150°C, TaMin_C=-55°C, U/M=EA, Vceo_V=25V, Vcesat1_V=5dV
R1 R2 R27 R28 R29 R30 R31 R32 R33 R34 R37 R40 R43 R44 R45 R46 R47 R48 R49 R50 R51 R52 R53 R62 R63 R64 R65 R66: library part CMP-0027011-4, "RES, 0, 5%, 0.05 W, AEC-Q200 Grade 1, 0201", Manufacturer=Panasonic, PartNumber=ERJ-1GE0R00C, Power_W=50mW, Supplier Part Number 1=P0.0AGCT-ND, TempCo="600 ppm/C", Tolerance_%=5%, Value2=0.05W, Value_Code=0000, ValueDisplayed=0, AEC Category=Q200, AEC Grade=1, AEC Qualified=Y, ComponentLink1Description="Datasheet link", ComponentLink1URL=https://industrial.panasonic.com/cdbs/www-data/pdf/RDA0000/AOA0000C301.pdf, CompType=Resistor, EIA_Code=E24, MountType=SMT, PackageReference=0201, Res_ohm=0, RoHS=Y, SizeArea_mm2=0.18, SizeAreaWB_mm2=2.08, SizeX_mm=0.6, SizeY_mm=0.3, SizeZ_mm=0.26, Supplier 1=Digi-Key, Supplier 2=Newark, Supplier 3=Mouser, Supplier Part Number 2=53W4043, Supplier Part Number 3=667-ERJ-1GE0R00C, Technology="Thick Film", Value1=5%, VDC_V=15V
R3 R8 R71 R73: library part CMP-0027008-4, "RES, 0, 5%, 0.05 W, 0201", Manufacturer=Vishay-Dale, Power_W=50mW, Supplier Part Number 1=72M6743, TempCo=ppm/C, Tolerance_%=5%, Value2=0.05W, Value_Code=0000, ValueDisplayed=0, AEC Category=Q200, AEC Grade=N/A, AEC Qualified=N, ComponentLink1Description="Datasheet link", ComponentLink1URL=http://www.vishay.com/docs/20052/crcw0201e3.pdf, CompType=Resistor, EIA_Code=E24, MountType=SMT, PackageReference=0201, PartNumber=CRCW02010000Z0ED, Res_ohm=0, RoHS=E, SizeArea_mm2=0.18, SizeX_mm=0.6, SizeY_mm=0.3, SizeZ_mm=0.26, Supplier 1=Newark, Technology="Thick Film", Value1=5%
R4 R10 R70: library part CMP-0028132-1, "RES, 100 k, 0.5%, 0.05 W, 0201", Manufacturer="Yageo America", Power_W=50mW, Supplier Part Number 1=RC0201DR-07100KL-ND, TempCo="200 ppm/C", Tolerance_%=0.5%, Value2=0.05W, Value_Code=100k, AEC Category=Q200, AEC Grade=N/A, AEC Qualified=N, ComponentLink1Description="Datasheet link", ComponentLink1URL=http://www.yageo.com/documents/recent/PYu-RC_Group_51_RoHS_L_5.pdf, CompType=Resistor, EIA_Code=E192, LatestRevisionDate=2017-03-09, MountType=SMT, PackageReference=0201, PartNumber=RC0201DR-07100KL, Published=2016-10-14, Publisher="Texas Instruments", Res_ohm=100k, RoHS=Y, SizeArea_mm2=0.18, SizeX_mm=0.6, SizeY_mm=0.3, SizeZ_mm=0.26, Supplier 1=Digi-Key, Supplier 2=Mouser, Supplier Part Number 2=603-RC0201DR-07100KL, Technology="Thick Film", U/M=EA, Value1=0.5%, ValueDisplayed=100k, VDC_V=25V
R5 R12 R72: library part CMP-0027757-1, "RES, 51.0 k, 1%, 0.05 W, 0201", Manufacturer="Yageo America", Power_W=50mW, Supplier Part Number 1=311-51.0KMCT-ND, TempCo="200 ppm/C", Tolerance_%=1%, Value2=0.05W, Value_Code=51k0, ValueDisplayed=51.0k, AEC Category=Q200, AEC Grade=N/A, AEC Qualified=N, ComponentLink1Description="Datasheet link", ComponentLink1URL=http://www.yageo.com/documents/recent/PYu-RC_Group_51_RoHS_L_5.pdf, CompType=Resistor, LatestRevisionDate=2017-03-09, MountType=SMT, PackageReference=0201, PartNumber=RC0201FR-0751KL, Published=2016-10-14, Publisher="Texas Instruments", Res_ohm=51k, RoHS=Y, SizeArea_mm2=0.18, SizeX_mm=0.6, SizeY_mm=0.3, SizeZ_mm=0.26, Supplier 1=Digi-Key, Supplier 2=Mouser, Supplier Part Number 2=603-RC0201FR-0751KL, Technology="Thick Film", U/M=EA, Value1=1%, VDC_V=25V
R6 R7: library part CMP-0025751-1, "RES, 200 M, 5%, 0.1 W, 0603", Manufacturer=Vishay-Dale, Power_W=100mW, Supplier Part Number 1=541-200MAHCT-ND, TempCo="500 ppm/C", Tolerance_%=5%, Value2=0.1W, Value_Code=200M, AEC Category=Q200, AEC Grade=N/A, AEC Qualified=N, ComponentLink1Description="Datasheet link", ComponentLink1URL=http://www.vishay.com/docs/20022/dcrcwhe3.pdf, CompType=Resistor, LatestRevisionDate=2017-03-09, MountType=SMT, PackageReference=0603, PartNumber=CRCW0603200MJPEAHR, Published=2008-06-26, Publisher="Texas Instruments", Res_ohm=200M, RoHS=Y, SizeArea_mm2=1.3175, SizeX_mm=1.55, SizeY_mm=0.85, SizeZ_mm=0.5, Supplier 1=Digi-Key, Supplier 2=Newark, Supplier 3=Mouser, Supplier Part Number 2=86R8508, Supplier Part Number 3=71-CRCW0603200MJPEA, Technology="Thick Film", U/M=EA, Value1=5%, ValueDisplayed=200M, VDC_V=75V
R9: library part CMP-0026402-2, "RES, 499, 1%, 0.063 W, AEC-Q200 Grade 0, 0402", Manufacturer=Vishay-Dale, PartNumber=CRCW0402499RFKED, Power_W=63mW, Supplier Part Number 1=541-499LCT-ND, TempCo="100 ppm/C", Tolerance_%=1%, Value2=0.063W, Value_Code=499R, ValueDisplayed=499, AEC Category=Q200, AEC Grade=0, AEC Qualified=Y, ComponentLink1Description="Datasheet link", ComponentLink1URL=http://www.vishay.com/docs/20035/dcrcwe3.pdf, CompType=Resistor, EIA_Code=E96, MountType=SMT, PackageReference=0402, Res_ohm=499, RoHS=E, SizeArea_mm2=0.5, SizeX_mm=1, SizeY_mm=0.5, SizeZ_mm=0.6, Supplier 1=Digi-Key, Supplier 2=Newark, Supplier 3=Mouser, Supplier Part Number 2=52K7117, Supplier Part Number 3=71-CRCW0402-499-E3, Technology="Thick Film", Value1=1%, VDC_V=50V
R11 R35 R42 R67: library part CMP-0026401-2, "RES, 499 k, 1%, 0.063 W, AEC-Q200 Grade 0, 0402", Manufacturer=Vishay-Dale, PartNumber=CRCW0402499KFKED, Power_W=63mW, Supplier Part Number 1=541-499KLCT-ND, TempCo="100 ppm/C", Tolerance_%=1%, Value2=0.063W, Value_Code=499k, AEC Category=Q200, AEC Grade=0, AEC Qualified=Y, ComponentLink1Description="Datasheet link", ComponentLink1URL=http://www.vishay.com/docs/20035/dcrcwe3.pdf, CompType=Resistor, EIA_Code=E96, MountType=SMT, PackageReference=0402, Res_ohm=499k, RoHS=E, SizeArea_mm2=0.5, SizeX_mm=1, SizeY_mm=0.5, SizeZ_mm=0.6, Supplier 1=Digi-Key, Supplier 2=Newark, Supplier 3=Mouser, Supplier Part Number 2=52K7116, Supplier Part Number 3=71-CRCW0402-499K-E3, Technology="Thick Film", Value1=1%, ValueDisplayed=499k, VDC_V=50V
R13 R83 R126: library part CMP-0026935-3, "RES, 47 k, 5%, 0.063 W, AEC-Q200 Grade 0, 0402", Manufacturer=Vishay-Dale, PartNumber=CRCW040247K0JNED, Power_W=63mW, Supplier Part Number 1=541-47KJCT-ND, TempCo="200 ppm/C", Tolerance_%=5%, Value2=0.063W, Value_Code=47k0, ValueDisplayed=47k, AEC Category=Q200, AEC Grade=0, AEC Qualified=Y, ComponentLink1Description="Datasheet link", ComponentLink1URL=http://www.vishay.com/docs/20035/dcrcwe3.pdf, CompType=Resistor, EIA_Code=E24, MountType=SMT, PackageReference=0402, Res_ohm=47k, RoHS=E, SizeArea_mm2=0.5, SizeX_mm=1, SizeY_mm=0.5, SizeZ_mm=0.6, Supplier 1=Digi-Key, Supplier 2=Newark, Supplier 3=Mouser, Supplier Part Number 2=52K7099, Supplier Part Number 3=71-CRCW0402-J-47K-E3, Technology="Thick Film", Value1=5%, VDC_V=50V
R14 R15 R16 R17 R18 R19 R20 R21 R22 R23 R24 R25 R26: library part CMP-0026658-1, "RES, 10.0 k, 1%, 0.1 W, 0402", Manufacturer=Panasonic, PartNumber=ERJ-2RKF1002X, Power_W=100mW, Supplier Part Number 1=P10.0KLCT-ND, TempCo="100 ppm/C", Tolerance_%=1%, Value2=0.1W, Value_Code=10k0, ValueDisplayed=10.0k, AEC Category=Q200, AEC Qualified=?, ComponentLink1Description="Datasheet link", ComponentLink1URL=http://industrial.panasonic.com/www-data/pdf/AOA0000/AOA0000CE2.pdf, CompType=Resistor, EIA_Code=E96, LatestRevisionDate=2017-03-09, MountType=SMT, PackageReference=0402, Published=2008-06-26, Publisher="Texas Instruments", Res_ohm=10k, RoHS=Y, SizeArea_mm2=0.5, SizeX_mm=1, SizeY_mm=0.5, SizeZ_mm=0.6, Supplier 1=Digi-Key, Supplier 2=Newark, Supplier 3=Mouser, Supplier Part Number 2=90W2949, Supplier Part Number 3=667-ERJ-2RKF1002X, Technology="Thick Film", U/M=EA, Value1=1%, VDC_V=50V
R36 R38 R39 R41 R56 R57 R58 R59 R60 R61 R68 R69 R84 R92 R93 R95 R97 R102 R103 R108 R111 R113 R115 R116 R118 R130 R131: library part CMP-0026822-3, "RES, 0, 5%, 0.063 W, AEC-Q200 Grade 0, 0402", Manufacturer=Vishay-Dale, PartNumber=CRCW04020000Z0ED, Power_W=63mW, Supplier Part Number 1=541-0.0JCT-ND, TempCo="200 ppm/C", Tolerance_%=5%, Value2=0.063W, Value_Code=0000, ValueDisplayed=0, AEC Category=Q200, AEC Grade=0, AEC Qualified=Y, ComponentLink1Description="Datasheet link", ComponentLink1URL=http://www.vishay.com/docs/20035/dcrcwe3.pdf, CompType=Resistor, EIA_Code=E24, MountType=SMT, PackageReference=0402, Res_ohm=0, RoHS=E, SizeArea_mm2=0.5, SizeX_mm=1, SizeY_mm=0.5, SizeZ_mm=0.6, Supplier 1=Digi-Key, Supplier 2=Newark, Supplier 3=Mouser, Supplier Part Number 2=52K6543, Supplier Part Number 3=71-CRCW0402-0-E3, Technology="Thick Film", Value1=5%, VDC_V=50V
R54 R55 R94: library part CMP-0025958-3, "RES, 10.0 k, 1%, 0.063 W, AEC-Q200 Grade 0, 0402", Manufacturer=Vishay-Dale, PartNumber=CRCW040210K0FKED, Power_W=63mW, Supplier Part Number 1=541-10.0KLCT-ND, TempCo="100 ppm/C", Tolerance_%=1%, Value2=0.063W, Value_Code=10k0, ValueDisplayed=10.0k, AEC Category=Q200, AEC Grade=0, AEC Qualified=Y, ComponentLink1Description="Datasheet link", ComponentLink1URL=http://www.vishay.com/docs/20035/dcrcwe3.pdf, CompType=Resistor, EIA_Code=E96, MountType=SMT, PackageReference=0402, Res_ohm=10k, RoHS=E, SizeArea_mm2=0.5, SizeX_mm=1, SizeY_mm=0.5, SizeZ_mm=0.6, Supplier 1=Digi-Key, Supplier 2=Newark, Supplier 3=Mouser, Supplier Part Number 2=52K6595, Supplier Part Number 3=71-CRCW0402-10K-E3, Technology="Thick Film", Value1=1%, VDC_V=50V
R74: library part CMP-0026403-2, "RES, 49.9 k, 1%, 0.063 W, AEC-Q200 Grade 0, 0402", Manufacturer=Vishay-Dale, Power_W=63mW, Supplier Part Number 1=541-49.9KLCT-ND, TempCo="100 ppm/C", Tolerance_%=1%, Value2=0.063W, Value_Code=49k9, ValueDisplayed=49.9k, AEC Category=Q200, AEC Grade=0, AEC Qualified=Y, ComponentLink1Description="Datasheet link", ComponentLink1URL=http://www.vishay.com/docs/20035/dcrcwe3.pdf, CompType=Resistor, EIA_Code=E96, MountType=SMT, PackageReference=0402, PartNumber=CRCW040249K9FKED, Res_ohm=49.9k, RoHS=E, SizeArea_mm2=0.5, SizeX_mm=1, SizeY_mm=0.5, SizeZ_mm=0.6, Supplier 1=Digi-Key, Supplier 2=Newark, Supplier 3=Mouser, Supplier Part Number 2=52K7113, Supplier Part Number 3=71-CRCW0402-49.9K-E3, Technology="Thick Film", Value1=1%, VDC_V=50V
R82 R90: library part CMP-0025951-3, "RES, 100, 1%, 0.063 W, AEC-Q200 Grade 0, 0402", Manufacturer=Vishay-Dale, PartNumber=CRCW0402100RFKED, Power_W=63mW, Supplier Part Number 1=541-100LCT-ND, TempCo="100 ppm/C", Tolerance_%=1%, Value2=0.063W, Value_Code=100R, ValueDisplayed=100, AEC Category=Q200, AEC Grade=0, AEC Qualified=Y, ComponentLink1Description="Datasheet link", ComponentLink1URL=http://www.vishay.com/docs/20035/dcrcwe3.pdf, CompType=Resistor, EIA_Code=E96, MountType=SMT, PackageReference=0402, Res_ohm=100, RoHS=E, SizeArea_mm2=0.5, SizeX_mm=1, SizeY_mm=0.5, SizeZ_mm=0.6, Supplier 1=Digi-Key, Supplier 2=Newark, Supplier 3=Mouser, Supplier Part Number 2=52K6609, Supplier Part Number 3=71-CRCW0402-100-E3, Technology="Thick Film", Value1=1%, VDC_V=50V
R85: library part CMP-0026085-3, "RES, 1.40 k, 1%, 0.063 W, AEC-Q200 Grade 0, 0402", Manufacturer=Vishay-Dale, PartNumber=CRCW04021K40FKED, Power_W=63mW, Supplier Part Number 1=541-1.40KLCT-ND, TempCo="100 ppm/C", Tolerance_%=1%, Value2=0.063W, Value_Code=1k40, ValueDisplayed=1.40k, AEC Category=Q200, AEC Grade=0, AEC Qualified=Y, ComponentLink1Description="Datasheet link", ComponentLink1URL=http://www.vishay.com/docs/20035/dcrcwe3.pdf, CompType=Resistor, EIA_Code=E96, MountType=SMT, PackageReference=0402, Res_ohm=1.4k, RoHS=E, SizeArea_mm2=0.5, SizeX_mm=1, SizeY_mm=0.5, SizeZ_mm=0.6, Supplier 1=Digi-Key, Supplier 2=Newark, Supplier 3=Mouser, Supplier Part Number 2=52K6569, Supplier Part Number 3=71-CRCW0402-1.4K-E3, Technology="Thick Film", Value1=1%, VDC_V=50V
R86 R87: library part CMP-0026908-3, "RES, 33, 5%, 0.063 W, AEC-Q200 Grade 0, 0402", Manufacturer=Vishay-Dale, PartNumber=CRCW040233R0JNED, Power_W=63mW, Supplier Part Number 1=541-33JCT-ND, TempCo="200 ppm/C", Tolerance_%=5%, Value2=0.063W, Value_Code=33R0, ValueDisplayed=33, AEC Category=Q200, AEC Grade=0, AEC Qualified=Y, ComponentLink1Description="Datasheet link", ComponentLink1URL=http://www.vishay.com/docs/20035/dcrcwe3.pdf, CompType=Resistor, EIA_Code=E24, MountType=SMT, PackageReference=0402, Res_ohm=33, RoHS=E, SizeArea_mm2=0.5, SizeX_mm=1, SizeY_mm=0.5, SizeZ_mm=0.6, Supplier 1=Digi-Key, Supplier 2=Newark, Supplier 3=Mouser, Supplier Part Number 2=72M6782, Supplier Part Number 3=71-CRCW0402J-33-E3, Technology="Thick Film", Value1=5%, VDC_V=50V
R88: library part CMP-0026907-3, "RES, 33 k, 5%, 0.063 W, AEC-Q200 Grade 0, 0402", Manufacturer=Vishay-Dale, PartNumber=CRCW040233K0JNED, Power_W=63mW, Supplier Part Number 1=541-33KJCT-ND, TempCo="200 ppm/C", Tolerance_%=5%, Value2=0.063W, Value_Code=33k0, ValueDisplayed=33k, AEC Category=Q200, AEC Grade=0, AEC Qualified=Y, ComponentLink1Description="Datasheet link", ComponentLink1URL=http://www.vishay.com/docs/20035/dcrcwe3.pdf, CompType=Resistor, EIA_Code=E24, MountType=SMT, PackageReference=0402, Res_ohm=33k, RoHS=E, SizeArea_mm2=0.5, SizeX_mm=1, SizeY_mm=0.5, SizeZ_mm=0.6, Supplier 1=Digi-Key, Supplier 2=Newark, Supplier 3=Mouser, Supplier Part Number 2=59M6727, Supplier Part Number 3=71-CRCW0402J-33K-E3, Technology="Thick Film", Value1=5%, VDC_V=50V
R89 R110: library part CMP-0026100-2, "RES, 1.00 M, 1%, 0.063 W, AEC-Q200 Grade 0, 0402", Manufacturer=Vishay-Dale, PartNumber=CRCW04021M00FKED, Power_W=63mW, Supplier Part Number 1=541-1.00MLCT-ND, TempCo="100 ppm/C", Tolerance_%=1%, Value2=0.063W, Value_Code=1M00, ValueDisplayed=1.00M, AEC Category=Q200, AEC Grade=0, AEC Qualified=Y, ComponentLink1Description="Datasheet link", ComponentLink1URL=http://www.vishay.com/docs/20035/dcrcwe3.pdf, CompType=Resistor, EIA_Code=E96, MountType=SMT, PackageReference=0402, Res_ohm=1M, RoHS=E, SizeArea_mm2=0.5, SizeX_mm=1, SizeY_mm=0.5, SizeZ_mm=0.6, Supplier 1=Digi-Key, Supplier 2=Newark, Supplier 3=Mouser, Supplier Part Number 2=52K6593, Supplier Part Number 3=71-CRCW0402-1.0M-E3, Technology="Thick Film", Value1=1%, VDC_V=50V
R91 R98 R99 R127: library part CMP-0026938-5, "RES, 4.7 k, 5%, 0.063 W, AEC-Q200 Grade 0, 0402", Manufacturer=Vishay-Dale, PartNumber=CRCW04024K70JNED, Power_W=63mW, Supplier Part Number 1=541-4.7KJCT-ND, TempCo="200 ppm/C", Tolerance_%=5%, Value2=0.063W, Value_Code=4k70, ValueDisplayed=4.7k, AEC Category=Q200, AEC Grade=0, AEC Qualified=Y, ComponentLink1Description="Datasheet link", ComponentLink1URL=http://www.vishay.com/docs/20035/dcrcwe3.pdf, CompType=Resistor, EIA_Code=E24, MountType=SMT, PackageReference=0402, Res_ohm=4.7k, RoHS=E, SizeArea_mm2=0.5, SizeX_mm=1, SizeY_mm=0.5, SizeZ_mm=0.6, Supplier 1=Digi-Key, Supplier 2=Newark, Supplier 3=Mouser, Supplier Part Number 2=59M6733, Supplier Part Number 3=71-CRCW0402J-4.7K-E3, Technology="Thick Film", Value1=5%, VDC_V=50V
R96 R100 R101: library part CMP-0025963-3, "RES, 10.0, 1%, 0.063 W, AEC-Q200 Grade 0, 0402", Manufacturer=Vishay-Dale, PartNumber=CRCW040210R0FKED, Power_W=63mW, Supplier Part Number 1=541-10.0LCT-ND, TempCo="100 ppm/C", Tolerance_%=1%, Value2=0.063W, Value_Code=10R0, ValueDisplayed=10.0, AEC Category=Q200, AEC Grade=0, AEC Qualified=Y, ComponentLink1Description="Datasheet link", ComponentLink1URL=http://www.vishay.com/docs/20035/dcrcwe3.pdf, CompType=Resistor, EIA_Code=E96, MountType=SMT, PackageReference=0402, Res_ohm=10, RoHS=E, SizeArea_mm2=0.5, SizeX_mm=1, SizeY_mm=0.5, SizeZ_mm=0.6, Supplier 1=Digi-Key, Supplier 2=Newark, Supplier 3=Mouser, Supplier Part Number 2=52K6600, Supplier Part Number 3=71-CRCW0402-10-E3, Technology="Thick Film", Value1=1%, VDC_V=50V
R104: library part CMP-0026878-3, "RES, 220, 5%, 0.063 W, AEC-Q200 Grade 0, 0402", Manufacturer=Vishay-Dale, PartNumber=CRCW0402220RJNED, Power_W=63mW, Supplier Part Number 1=541-220JCT-ND, TempCo="200 ppm/C", Tolerance_%=5%, Value2=0.063W, Value_Code=220R, ValueDisplayed=220, AEC Category=Q200, AEC Grade=0, AEC Qualified=Y, ComponentLink1Description="Datasheet link", ComponentLink1URL=http://www.vishay.com/docs/20035/dcrcwe3.pdf, CompType=Resistor, EIA_Code=E24, MountType=SMT, PackageReference=0402, Res_ohm=220, RoHS=E, SizeArea_mm2=0.5, SizeX_mm=1, SizeY_mm=0.5, SizeZ_mm=0.6, Supplier 1=Digi-Key, Supplier 2=Newark, Supplier 3=Mouser, Supplier Part Number 2=59M6718, Supplier Part Number 3=71-CRCW0402J-220-E3, Technology="Thick Film", Value1=5%, VDC_V=50V